# Altium PCB OCL_15W.PcbDoc
Units mm, origin at the board's own origin, x right, y up, seen from the top; angles counter-clockwise.
Board outline 152.4 x 101.6 mm, 2 copper layers (Top Layer, Bottom Layer); 48 components, 30 nets, 117 pads, 0 vias.
Unrouted connection lines stored in the file: 3.
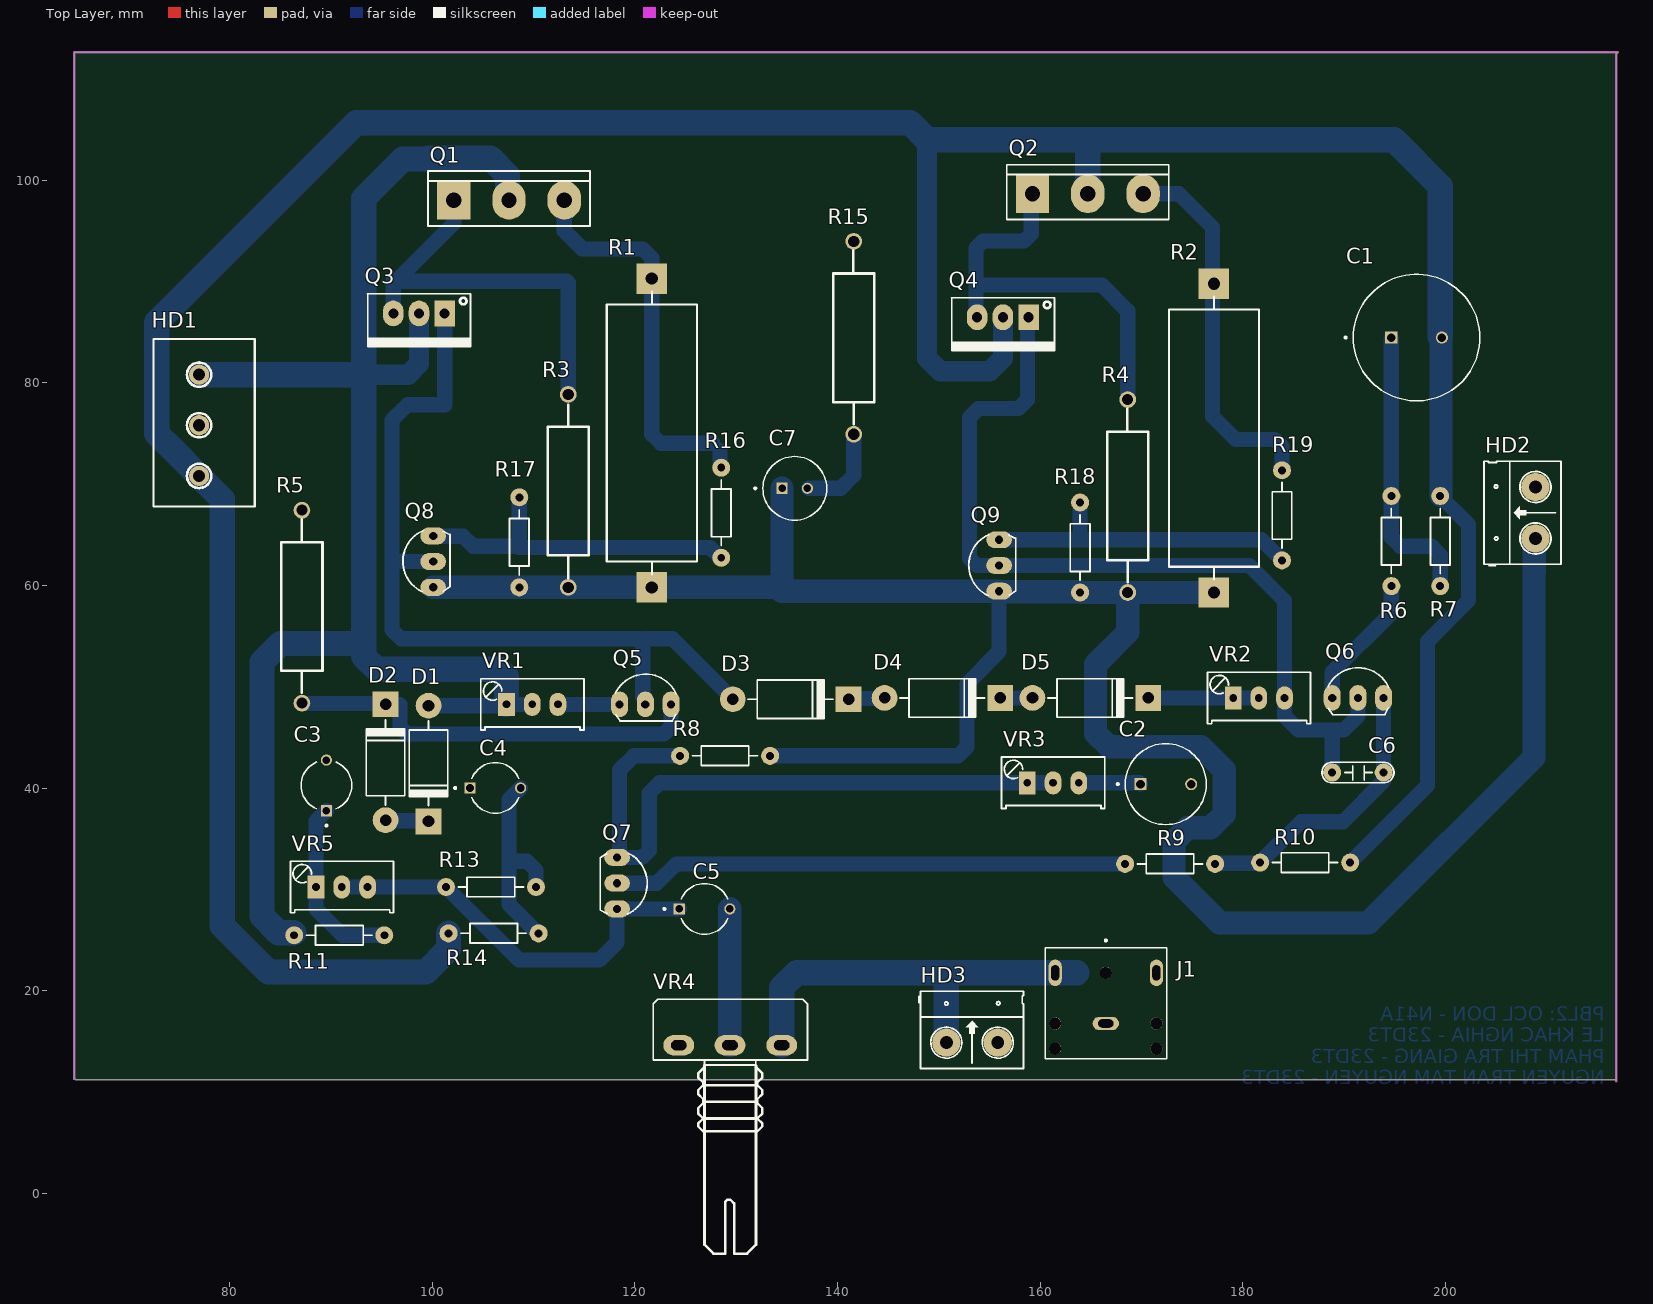
[diagram p0: Top Layer view]
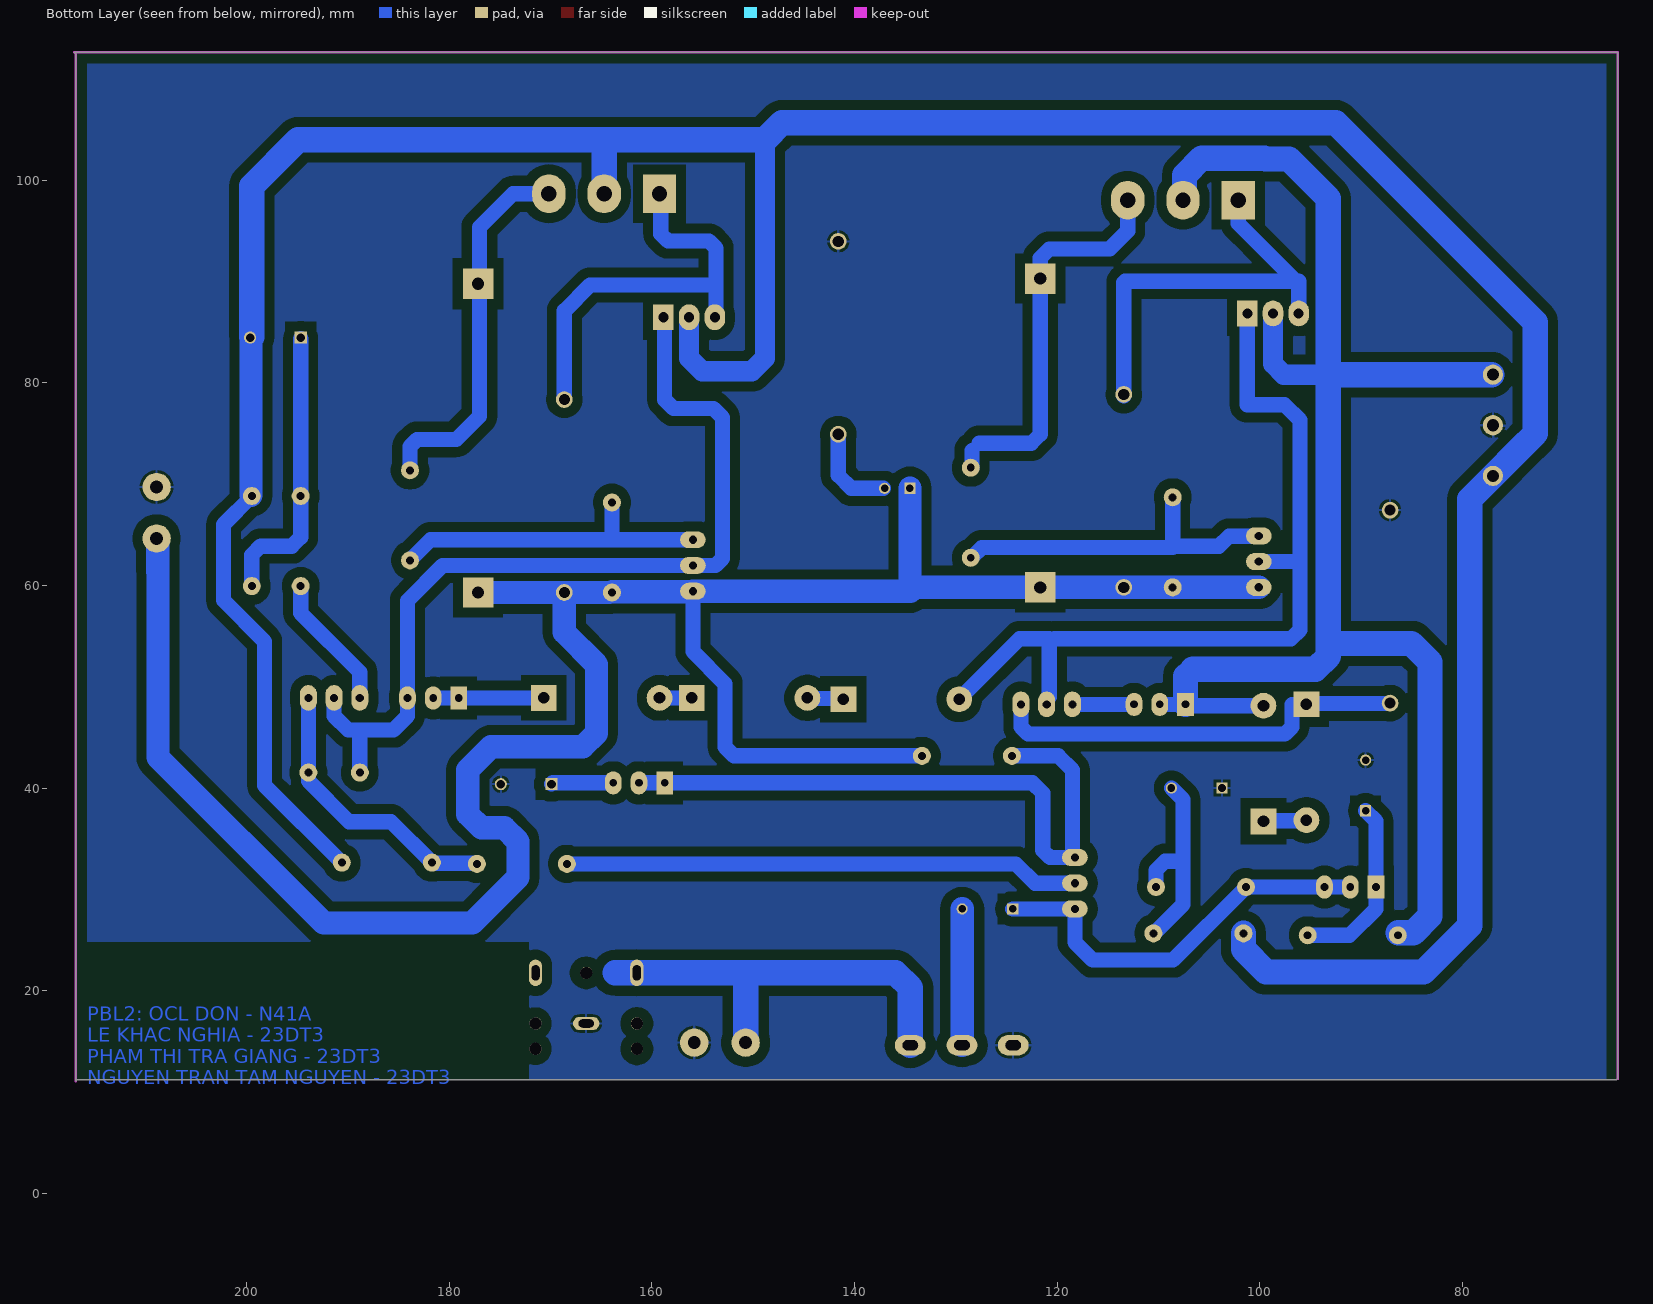
[diagram p1: Bottom Layer view, seen from below]
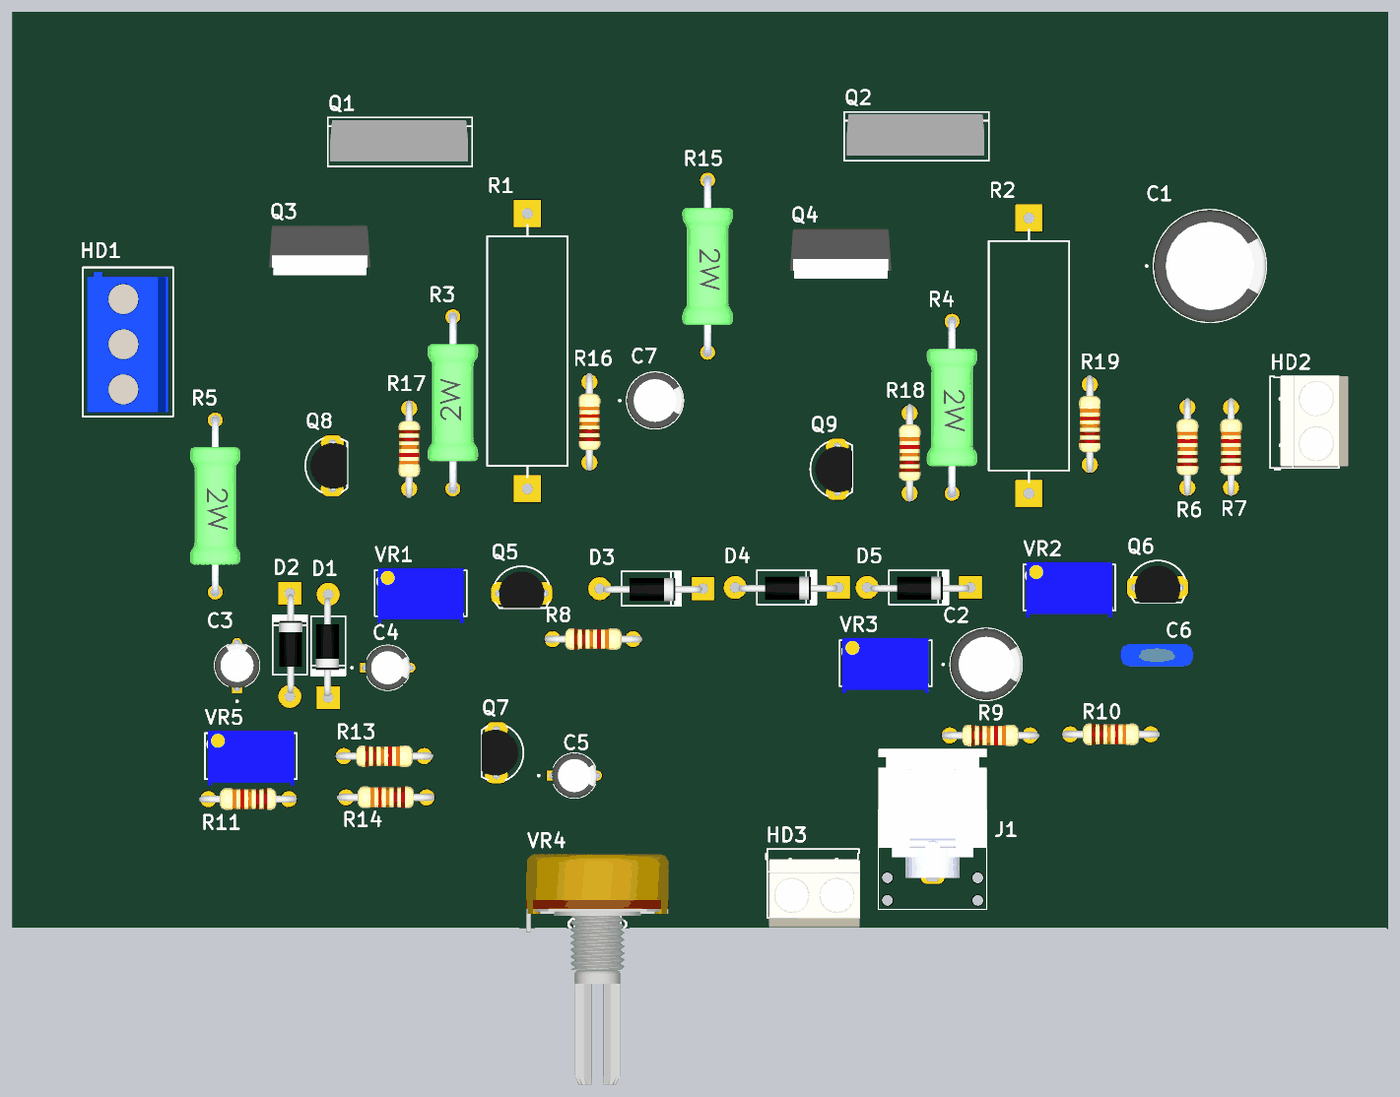
[diagram p2: 3D render of the assembled board from above, using the file's embedded part models]

## Layer stack, top to bottom
Top Solder: solder mask 0.0102, Solder Resist, Dk 3.5
Top Layer: signal copper 0.0356
Dielectric 1: dielectric 0.32, FR-4, Dk 4.8
Bottom Layer: signal copper 0.0356
Bottom Solder: solder mask 0.0102, Solder Resist, Dk 3.5

## Board outline
64.77,11.176 64.643,11.303 64.643,112.649 217.043,112.649 216.916,112.522 216.916,11.049 216.789,11.176

## Design rules (kind name [scope] priority, off if disabled: settings)
Clearance [All] p1: gap=1 ignorepadtopadclearanceinfootprint=FALSE
PolygonConnect [All] p1: connectstyle=Relief reliefconductorwidth=0.254 reliefentries=4 polygonreliefangle="90 Angle" airgapwidth=0.254
RoutingVias [All] p1: holewidth=0.711 width=1.27 viastyle="Through Hole" minholewidth=0.711 minwidth=1.27 maxholewidth=0.711 maxwidth=1.27
SolderMaskExpansion [All] p1: expansion=0.102 istentingtop=FALSE
Width Width_1 [All] p1: maxlimit=2.3 minlimit=1.2 preferedwidth=1.5
30 further rules are at their usual default settings.

## Components (designator, comment, footprint, x,y, rotation, side; value= is the part's Value field where it differs from the comment)
C1 "470uF/50V" CAPPRD500W60D1250H2000 197.182,84.481 r0 top
C2 "220uF/50V" CAPPRD500W60D800H2000 172.426,40.386 r0 top
C3 "0.1uF/50V" CAPPRD500W50D500H1100 89.535,40.259 r90 top
C4 "0.1uF/50V" CAPPRD500W50D500H1100 106.212,40.005 r0 top
C5 "EEUHD1HR47B" CAPPRD500W50D500H1100 126.873,28.067 r0 top
C6 "104" CN2 193.929,41.529 r180 top value=0.1uF
C7 "10uF/50V" CAPPRD250W50D630H1120 135.783,69.596 r0 top
D1 "1N4007" D2A 99.619,36.703 r90 top
D2 "1N4007" D2A 95.377,48.26 r270 top
D3 "1N4007" D2A 141.097,48.768 r180 top
D4 "1N4007" D2A 156.083,48.895 r180 top
D5 "1N4007" D2A 170.688,48.895 r180 top
HD1 "Header 3" HED3 76.962,75.819 r90 top
HD2 "Header 2" HED2 208.915,64.643 r90 top
HD3 "Header 2" HED2 150.749,14.859 r0 top
J1 "SJ1-3523N" CUI_SJ1-3523N 166.497,16.752 r0 top
Q1 "D718" QTO-247 102.108,98.044 r0 top
Q2 "B688" QTO-247 159.258,98.679 r0 top
Q3 "TIP41C" QTO-220 101.219,86.868 r180 top
Q4 "TIP42C" QTO-220 158.877,86.487 r180 top
Q5 "A1013" QTO-92 121.031,48.26 r0 top value=A1015
Q6 "C2383" QTO-92 191.389,48.895 r0 top value=C1815
Q7 "A1015" QTO-92 118.237,30.607 r270 top
Q8 "C1815" QTO-92 100.076,62.357 r90 top
Q9 "A1015" QTO-92 155.956,61.976 r90 top
R1 "0.22/5W Res Power" "DIEN TRO 5W" 121.666,59.817 r90 top
R2 "0.22/5W Res Power" "DIEN TRO 5W" 177.165,89.789 r270 top
R3 "220/2W" R2W 113.411,69.342 r90 top value="R2W - 47"
R4 "220/2W" R2W 168.656,68.834 r270 top value="R2W - 47"
R5 "2k/2W" R2W 87.122,57.912 r270 top value="R2W - 47"
R6 "43" R1/4W 194.691,68.834 r270 top value="R1/4W - 1K"
R7 "56" R1/4W 199.517,68.834 r270 top value="R1/4W - 1K"
R8 "2.4k" R1/4W 133.35,43.18 r180 top value="R1/4W - 1K"
R9 "12k" R1/4W 177.292,32.512 r180 top value="R1/4W - 1K"
R10 "3k" R1/4W 190.627,32.639 r180 top value="R1/4W - 1K"
R11 "200k" R1/4W 86.36,25.464 r0 top value="R1/4W - 1K"
R13 "330k" R1/4W 110.236,30.226 r180 top value="R1/4W - 1K"
R14 "200k" R1/4W 101.6,25.654 r0 top value="R1/4W - 1K"
R15 "4.3/2W" R2W 141.605,84.455 r270 top value="R2W - 47"
R16 "1.5k" R1/4W 128.524,71.628 r270 top value="R1/4W - 1K"
R17 "2k" R1/4W 108.585,59.817 r90 top value="R1/4W - 1K"
R18 "2k" R1/4W 163.957,68.199 r270 top value="R1/4W - 1K"
R19 "1.5k" R1/4W 183.896,71.374 r270 top value="R1/4W - 1K"
VR1 "200" VR1 107.315,48.26 r0 top value="VR 10K"
VR2 "100" VR1 179.07,48.895 r0 top value="VR 10K"
VR3 "470" VR1 158.75,40.513 r0 top value="VR 10K"
VR4 "50K" VR-S1 129.413,14.605 r0 top value="Volume 50k"
VR5 "200" VR1 88.519,30.226 r0 top value="VR 10K"

## Footprints (in the part's own frame and the unit in brackets; to place one, negate y for a bottom-side part, rotate by r counter-clockwise, add the part's x,y. Pads: shape width x height; smd on the part's side, far side on the other; paste and mask are expansions set on the pad)
CAPPRD250W50D630H1120 [mm]
  round 1.1 hole 0.75: N(1.25,0)
  rect 1.1x1.1 hole 0.75: P(-1.25,0)
  silkscreen extent -4,-3.15 3.15,3.15, body extent -3.15,-3.15 3.15,3.15, height 11.2
CAPPRD500W50D500H1100 [mm]
  round 1.1 hole 0.75: N(2.5,0)
  rect 1.1x1.1 / inner round 1.1 / far side rect 1.1x1.1 hole 0.75: P(-2.5,0)
  silkscreen extent -4.06,-2.5 2.32,2.5, body extent -2.75,-2.5 2.75,2.5, height 12.5
CAPPRD500W60D800H2000 [mm]
  round 1.2 hole 0.85: N(2.5,0)
  rect 1.2x1.2 hole 0.85: P(-2.5,0)
  silkscreen extent -4.85,-4 4,4, body extent -4,-4 4,4, height 20
CAPPRD500W60D1250H2000 [mm]
  round 1.2 hole 0.85: N(2.5,0)
  rect 1.2x1.2 hole 0.85: P(-2.5,0)
  silkscreen extent -7.1,-6.25 6.25,6.25, body extent -6.25,-6.25 6.25,6.25, height 20
CN2 [mil]
  round 70 hole 31: 1(0,0) 2(200,0)
  silkscreen extent -40,-40 240,40, body extent -54,-44 260,55, height 407
CUI_SJ1-3523N [mm]
  oval 2.616x1.308 hole 0.8 slot 1.5 at 0 deg: 1(0,0)
  oval 1.308x2.616 hole 0.8 slot 1.5 at 90 deg: 2(5,5) 3(-5,5)
  round 1.2 hole 1.2 unplated: ""(-5,-2.5) ""(-5,0) ""(0,5) ""(5,-2.5) ""(5,0)
  silkscreen extent -6,-3.5 6,8.3, body extent -6,0 6,14.3, height 3.01
D2A [mil] "Diode 2A, W 150mil, L 450mil"
  round 100 hole 45: 1(450,0)
  rect 100x100 hole 45: 2(0,0)
  silkscreen extent 61,-75 391,75, body extent 5,-47 435,54, height 100
"DIEN TRO 5W" [mm]
  rect 3x3 hole 1.2: 1(0,0) 2(30.48,0)
  silkscreen extent 1.27,-4.44 29.21,4.45, body extent 2.54,-4.44 27.94,4.45, height 7.62
HED2 [mil] "Header 2, 2 pin, hight 300mil, Pin to Pin 200, Colour Green"
  round 110 hole 50: 1(0,0) 2(200,0)
  silkscreen extent -106,-100 300,200, body extent -92,-140 302,155, height 394
HED3 [mm]
  round 2 hole 1.2 mask+0.01: 1(-5,0) 2(0,0) 3(5,0)
  silkscreen extent -8,-5.5 8.5,4.5, body extent -7.5,-5 8,4, height 12.5
QTO-92 [mil] "TO-92"
  oval 66x100 hole 32: 1(-100,0) 2(0,0) 3(100,0)
  silkscreen extent -117,-65 120,118, body extent -109,-66 109,95, height 245
QTO-220 [mil] "TO-220 - 1-2-3"
  rect 80x100 hole 39: 1(0,0)
  oval 80x100 hole 39: 2(100,0) 3(200,0)
  silkscreen extent -100,-76 300,130, body extent -121,-85 321,100, height 755
QTO-247 [mil] "TO-247"
  rect 130x150 hole 60: 1(0,0)
  oval 130x150 hole 60: 2(215,0) 3(430,0)
  silkscreen extent -100,-100 530,113, body extent -89,-78 511,102, height 941
R1/4W [mil] "R 1/4W, 2 Pin, 350mil"
  round 70 hole 31: 1(0,0) 2(350,0)
  silkscreen extent 48,-38 302,38, body extent -40,-47 386,47, height 111
R2W [mil] "dien tro 2W"
  round 65 hole 43.31: 1(-375,0) 2(375,0)
  silkscreen extent -340,-80 335,80, body extent -391,-110 391,110, height 307
VR1 [mil] "Variable Resistor"
  rect 65x90 hole 30: 1(0,0)
  oval 65x90 hole 30: 2(100,0) 3(200,0)
  silkscreen extent -100,-100 301,100, body extent -88,-130 288,110, height 455
VR-S1 [mil]
  oval 120x78.74 hole 40 slot 60 at 0 deg: 1(-200,0) 2(-1,0) 3(200,0)
  silkscreen extent -299,-810 300,179, body extent -310,-818 310,188, height 839

## Part data
C1: library part EEUEB1H471B, "Cap Aluminum 470uF 50V 20% (12.5 X 20mm) Radial 5mm 370mA 10000 hr 105C Ammo Pack", Package="RADIAL-2 Panasonic", Availability="In Stock", Check_prices=https://www.snapeda.com/parts/EEU-EB1H471B/Panasonic/view-part/?ref=eda, MF=Panasonic, MP=EEU-EB1H471B, Price=None, Purchase-URL=https://pricing.snapeda.com/search/part/EEU-EB1H471B/?ref=eda, SnapEDA_Link=https://www.snapeda.com/parts/EEU-EB1H471B/Panasonic/view-part/?ref=snap
C2: library part EEUFS1H221LB, "CAP ALUM 220UF 20% 50V RADIAL", Package="RADIAL-2 Panasonic", Availability="In Stock", Check_prices=https://www.snapeda.com/parts/EEU-FS1H221LB/Panasonic/view-part/6222710/?ref=eda, MF="Panasonic Electronic Components", MP=EEU-FS1H221LB, Price=None, Purchase-URL=https://pricing.snapeda.com/search/part/EEU-FS1H221LB/?ref=eda, SnapEDA_Link=https://www.snapeda.com/parts/EEU-FS1H221LB/Panasonic/view-part/6222710/?ref=snap
C3 C4: library part EEUHD1HR47B, "CAP ALUM 0.47UF 20% 50V RADIAL", Package="RADIAL-2 Panasonic", Check_prices=https://www.snapeda.com/parts/EEUHD1HR47B/Panasonic/view-part/?ref=eda, MF=Panasonic, MP=EEUHD1HR47B, SnapEDA_Link=https://www.snapeda.com/parts/EEUHD1HR47B/Panasonic/view-part/?ref=snap
C5: "CAP ALUM 0.47UF 20% 50V RADIAL", Package="RADIAL-2 Panasonic", Check_prices=https://www.snapeda.com/parts/EEUHD1HR47B/Panasonic/view-part/?ref=eda, MF=Panasonic, MP=EEUHD1HR47B, SnapEDA_Link=https://www.snapeda.com/parts/EEUHD1HR47B/Panasonic/view-part/?ref=snap
C6: library part CN2, "Cap np 104 => 105pF"
C7: library part ECEA1HN100UI, "CAP ALUM 10UF 20% 50V RADIAL", Package="RADIAL-2 Panasonic", Availability="In Stock", Check_prices=https://www.snapeda.com/parts/ECE-A1HN100UI/Panasonic/view-part/2321690/?ref=eda, MF=Panasonic, MP=ECE-A1HN100UI, Price=None, SnapEDA_Link=https://www.snapeda.com/parts/ECE-A1HN100UI/Panasonic/view-part/2321690/?ref=snap
D1 D2 D3 D4 D5: library part D1A, "Diode 1A"
HD1: library part Hed3, "Header 3 (Green)"
HD2 HD3: library part Hed2, "Header 2 (Green)"
J1: "3.5 mm, Stereo, Right Angle, Through Hole, 3 Conductors, 0 Internal Switches, Audio Jack Connector", Package=None, Check_prices=https://www.snapeda.com/parts/SJ1-3523N/Same+Sky/view-part/?ref=eda, MF="Same Sky", MP=SJ1-3523N, SnapEDA_Link=https://www.snapeda.com/parts/SJ1-3523N/Same+Sky/view-part/?ref=snap
Q1 Q2: "Transistor Power Supply"
Q3: "NPN 2W, BCE"
Q4: "PNP 2W, BCE"
Q5: library part PNP_ECB, "P 600mW, ECB"
Q6: library part NPN_ECB, "P 600mW, ECB"
Q7 Q9: "PNP 600mW, ECB"
Q8: "NPN 600mW, ECB"
R1 R2: library part "Res 5W", "5W Res Power", Creator="Nguyen Ba Bien"
R3 R4 R5 R15: library part R2W, "Resistor 2W"
R6 R7 R8 R9 R10 R11 R13 R14 R16 R17 R18 R19: library part R1/4W, "Resistor 1/4W"
VR1 VR2 VR3 VR5: library part VR, "Var Resistor"
VR4: library part VR-S, "Var Resistor"

## Nets (pads, with @x,y where several pads share a name; then routed paths per layer and width w, separated by ;. In a path a pad name is that pad's centre, name@x,y a point inside that pad or via, vN(x,y) a via of type N, cw(c..) or ccw(c..) an arc to the next point about the centre after c; other vN are vias at no path point)
GND: C2.N C3.N C4.P HD1.2 HD2.2 HD3.2 J1.1 R5.1 R15.1 VR4.1
NetC1_N: C1.N HD1.1 Q2.2 Q4.2 R7.1 R10.1 R14.1 | length 338.6
  Bottom Layer w1.2: R7.1@199.517,68.809 R7.1 R7.1@199.604,68.921
  Bottom Layer w1.5: R10.1@190.68,32.692 198.247,40.259 198.247,54.476 202.311,58.54 202.311,66.015 R7.1@199.517,68.809
  Bottom Layer w2: 148.844,104.013 148.844,82.442 150.133,81.153 155.048,81.153 156.337,82.442 Q4.2@156.337,86.367
  Bottom Layer w2.3: R7.1@199.604,68.921 C1.N@199.604,84.455
  Bottom Layer w2.5: R14.1 101.6,24.08 99.364,21.844 83.82,21.844 79.248,26.416 79.248,68.533 HD1.1 74.412,73.369 72.771,75.01 72.771,85.979 92.491,105.699 147.158,105.699 148.844,104.013 164.719,104.013 ; Q2.2 164.719,104.013 ; C1.N@199.517,84.542 199.517,99.441 194.945,104.013 164.719,104.013
NetC1_P: C1.P R6.1 R7.2 | length 28.2
  Bottom Layer w1.5: C1.P@194.691,84.368 R6.1 194.691,64.76 195.57,63.881 198.638,63.881 199.517,63.002 R7.2
NetC2_P: C2.P VR3.3 | length 6.1
  Bottom Layer w1.5: VR3.3 169.799,40.513 C2.P
NetC3_P: C3.P R11.2 VR5.1 | length 17.9
  Bottom Layer w1.5: C3.P 88.519,36.743 VR5.1 88.519,28.067 91.122,25.464 R11.2
NetC4_N: C4.N R13.1 R14.2 | length 21
  Bottom Layer w1.2: R13.1@110.252,30.21 R13.1@110.363,30.099
  Bottom Layer w1.5: C4.N 107.569,38.862 107.569,33.02 ; R13.1 110.236,31.887 109.357,32.766 107.823,32.766 107.569,33.02 ; R14.2 110.415,25.654 107.569,28.5 107.569,33.02
NetC5_N: C5.N VR4.2 | length 13.5
  Bottom Layer w2.3: C5.N 129.373,14.62 VR4.2
NetC5_P: C5.P Q7.3 R13.2 VR5.2 VR5.3 | length 40.1
  Bottom Layer w1.5: VR5.2 VR5.3 R13.2 ; R13.2@101.473,30.099 108.557,23.015 116.487,23.015 118.237,24.765 Q7.3 C5.P
NetC6_1: C6.1 Q6.3 R9.1 R10.2 | length 28.2
  Bottom Layer w1.2: R9.1 R9.1@177.356,32.575 ; R10.2@181.673,32.575 R10.2
  Bottom Layer w1.5: R9.1@177.356,32.575 R10.2@181.673,32.575 ; R10.2 185.764,36.666 189.915,36.666 193.929,40.68 Q6.3
NetC6_2: C6.2 Q4.1 Q6.2 Q9.2 VR2.3 | length 86.9
  Bottom Layer w1.2: Q9.2@155.829,61.976 Q9.2
  Bottom Layer w1.5: Q9.2@155.829,61.976 153.738,61.976 153.035,62.679 153.035,76.591 153.914,77.47 157.871,77.47 158.75,78.349 Q4.1@158.75,86.487 ; Q9.2 180.672,61.976 184.15,58.498 VR2.3 184.15,47.107 185.537,45.72 188.694,45.72 ; C6.2@188.849,41.604 188.849,45.72 189.991,45.72 191.389,47.118 Q6.2
NetC7_N: C7.N R15.2 | length 9
  Bottom Layer w1.5: C7.N@137.137,69.596 140.316,69.596 141.605,70.885 R15.2
NetC7_P: C7.P HD2.1 Q8.1 Q9.1 R1.1 R2.2 R3.1 R4.2 R8.1 R17.1 R18.2 | length 233
  Top Layer w1.2: HD2.1@208.788,64.77 HD2.1
  Bottom Layer w1.2: R18.2@163.83,59.563 R18.2@163.957,59.563
  Bottom Layer w1.5: R8.1 151.902,43.18 152.781,44.059 152.781,50.292 155.956,53.467 Q9.1@155.956,59.372 ; 134.132,59.817 134.513,59.436
  Bottom Layer w2.2: 208.788,61.341 208.801,61.354 ; HD2.1@208.801,64.529 HD2.1
  Bottom Layer w2.3: Q8.1 R17.1 134.132,59.817 ; 134.513,59.436 Q9.1 ; 134.533,59.456 C7.P ; Q9.1@155.956,59.372 R18.2@163.893,59.372 ; R18.2@164.24,59.309 R4.2 ; R2.2 R4.2 ; 208.788,61.341 208.788,43.053 192.405,26.67 177.75,26.67 173.228,31.192 173.228,34.721 174.575,36.068 176.834,36.068 178.181,37.415 178.181,41.783 175.895,44.069 166.828,44.069 165.481,45.416 165.481,52.197 168.656,55.372 R4.2 ; 208.801,61.354 HD2.1@208.801,64.529
NetD1_1: D1.1 HD1.3 Q1.2 Q3.2 R11.1 VR1.1 VR1.2 | length 159
  Top Layer w1.5: VR1.1@107.24,48.133 107.315,48.208 VR1.1
  Bottom Layer w1.5: D1.1 VR1.1@107.24,48.133 ; 106.612,51.74 107.315,51.037 ; VR1.1 VR1.2
  Bottom Layer w2: 93.218,80.819 97.616,80.819 98.679,81.882 Q3.2
  Bottom Layer w2.3: 91.948,80.819 93.218,80.819
  Bottom Layer w2.5: HD1.3@77.089,80.819 91.948,80.819 ; R11.1@86.307,25.707 84.833,25.707 83.185,27.355 83.185,52.451 85.014,54.28 93.218,54.28 ; 106.612,51.74 94.488,51.74 93.218,53.01 93.218,54.28 ; VR1.1 107.315,51.037 ; Q1.2 107.416,98.197 107.416,100.504 105.721,102.199 99.525,102.199 99.434,102.108 97.106,102.108 93.218,98.22 93.218,80.819 93.218,54.28
NetD1_2: D1.2 D2.1 | length 4.3
  Bottom Layer w1.5: D2.1 95.441,36.767 99.556,36.767 D1.2
NetD2_2: D2.2 Q5.3 R5.2 | length 41.3
  Bottom Layer w1.5: R5.2@87.153,48.356 87.154,48.358 87.258,48.358 87.259,48.356 D2.2@95.281,48.356 ; D2.2 96.809,48.26 96.809,46.042 97.512,45.339 122.868,45.339 123.571,46.042 Q5.3
NetD3_1: D3.1 Q3.1 Q5.2 Q8.2 | length 82.8
  Bottom Layer w1.2: 120.269,54.737 120.777,54.737
  Bottom Layer w1.5: Q8.2 96.139,62.357 96.012,62.23 ; Q3.1 101.219,77.851 97.536,77.851 96.012,76.327 96.012,62.23 ; 120.269,54.737 96.891,54.737 96.012,55.616 96.012,62.23 ; Q5.2 121.031,48.74 120.777,48.994 120.777,54.737 123.698,54.737 D3.1
NetD3_2: D3.2 D4.1 | length 3.6
  Bottom Layer w1.5: D3.2 141.16,48.831 144.589,48.831 D4.1
NetD4_2: D4.2 D5.1 | length 3.2
  Bottom Layer w1.5: D4.2 D5.1
NetD5_2: D5.2 VR2.1 VR2.2 | length 10.9
  Bottom Layer w1.5: D5.2 VR2.1 VR2.2
NetHD3_1: HD3.1 J1.3 VR4.3 | length 42.4
  Bottom Layer w1.5: 150.749,21.571 150.929,21.752
  Bottom Layer w2.5: VR4.3 134.493,20.287 135.957,21.752 150.929,21.752 163.647,21.752 ; HD3.1 150.749,21.571
NetQ1_1: Q1.1 Q3.3 R3.2 | length 43.1
  Bottom Layer w1.2: 96.139,90.043 96.393,90.043 ; 101.382,95.032 101.405,95.032 ; 113.284,90.043 113.411,89.916
  Bottom Layer w1.5: Q3.3 96.139,90.043 ; 101.382,95.032 96.393,90.043 113.284,90.043 ; Q1.1@101.382,97.318 Q1.1 102.108,95.735 101.405,95.032 ; R3.2@113.411,78.74 113.411,89.916
NetQ1_3: Q1.3 R1.2 R16.1 | length 40.5
  Bottom Layer w1.2: 127.694,74.041 128.413,73.322 ; R16.1@128.413,71.612 R16.1@128.524,71.501
  Bottom Layer w1.5: Q1.3@113.03,99.06 113.03,94.996 114.808,93.218 120.777,93.218 121.666,92.329 R1.2 121.666,74.93 122.555,74.041 127.694,74.041 ; R16.1@128.413,71.612 128.413,73.322
NetQ2_1: Q2.1 Q4.3 R4.1 | length 41.6
  Bottom Layer w1.5: Q4.3@153.67,86.487 153.67,89.662 ; Q2.1@159.131,98.679 159.131,94.715 158.428,94.012 154.373,94.012 153.67,93.309 153.67,89.662 ; R4.1 168.656,87.122 166.116,89.662 153.67,89.662
NetQ2_3: Q2.3 R2.1 R19.1 | length 37.5
  Bottom Layer w1.5: Q2.3@170.053,98.679 173.736,98.679 177.038,95.377 177.038,89.408 177.038,76.708 179.324,74.422 183.193,74.422 183.896,73.719 R19.1
NetQ5_1: Q5.1 VR1.3 | length 6.1
  Bottom Layer w1.2: Q5.1@118.364,48.48 Q5.1@118.364,48.514
  Bottom Layer w1.5: VR1.3 Q5.1
NetQ6_1: Q6.1 R6.2 | length 13.5
  Bottom Layer w1.5: Q6.1 188.849,51.435 194.691,57.277 R6.2
NetQ7_1: Q7.1 R8.2 VR3.1 VR3.2 | length 64.3
  Bottom Layer w1.5: R8.2 119.888,43.18 118.491,41.783 118.491,33.147 120.709,33.147 121.412,33.85 121.412,39.507 122.418,40.513 VR3.1 VR3.2
NetQ7_2: Q7.2 R9.2 | length 50.7
  Bottom Layer w1.5: Q7.2@118.491,30.607 122.174,30.607 124.079,32.512 R9.2
NetQ8_3: Q8.3 R16.2 R17.2 | length 34.3
  Bottom Layer w1.5: Q8.3 100.11,64.863 103.031,64.863 104.013,63.881 108.458,63.881 108.585,63.754 ; R17.2 108.585,63.754 ; R16.2 128.449,62.738 127.433,63.754 108.585,63.754
NetQ9_3: Q9.3 R18.1 R19.2 | length 32.8
  Top Layer w1.5: R19.2@183.843,62.537 R19.2
  Bottom Layer w1.2: R19.2@183.74,62.484 R19.2
  Bottom Layer w1.5: Q9.3@155.829,64.516 Q9.3 163.83,64.516 ; R18.1 163.957,64.643 163.83,64.516 ; R19.2@183.843,62.537 181.864,64.516 163.83,64.516
pads on no net: J1. J1.2

## Polygon pours and split planes (outlines as drawn)
GND on Bottom Layer "GND_L02_P002" (solid, pour order 2): 64.664,112.776 64.67,112.77 216.941,112.77 216.941,11.307 216.938,11.304 216.936,11.305 64.663,11.305

## Keep-outs
Keep-Out Layer:
  lines w0.254: 64.643,11.303 64.643,112.649 217.043,112.649 ; 216.916,11.049 216.916,112.522

## Other copper
Bottom Layer:
  text "PBL2: OCL DON - N41A / LE KHAC NGHIA - 23DT3 / PHAM THI TRA GIANG - 23DT3 / NGUYEN TRAN TAM NGUYEN - 23DT3" at 215.773,10.727 h1.4

## Text inside footprints (layer, text, board x,y; h text height)
J1: Mechanical 13 "PCB EDGE" at 173.497,13.502 h0.81